# Altium PCB Secondary-PCB.PcbDoc (part 1 of 2)
Units mil, origin at the board's own origin, x right, y up, seen from the top; angles counter-clockwise.
Board outline 1653.54 x 3188.98 mil, 2 copper layers (Top Layer, Bottom Layer), stack 57 mil thick; 59 components, 38 nets, 219 pads, 81 vias.
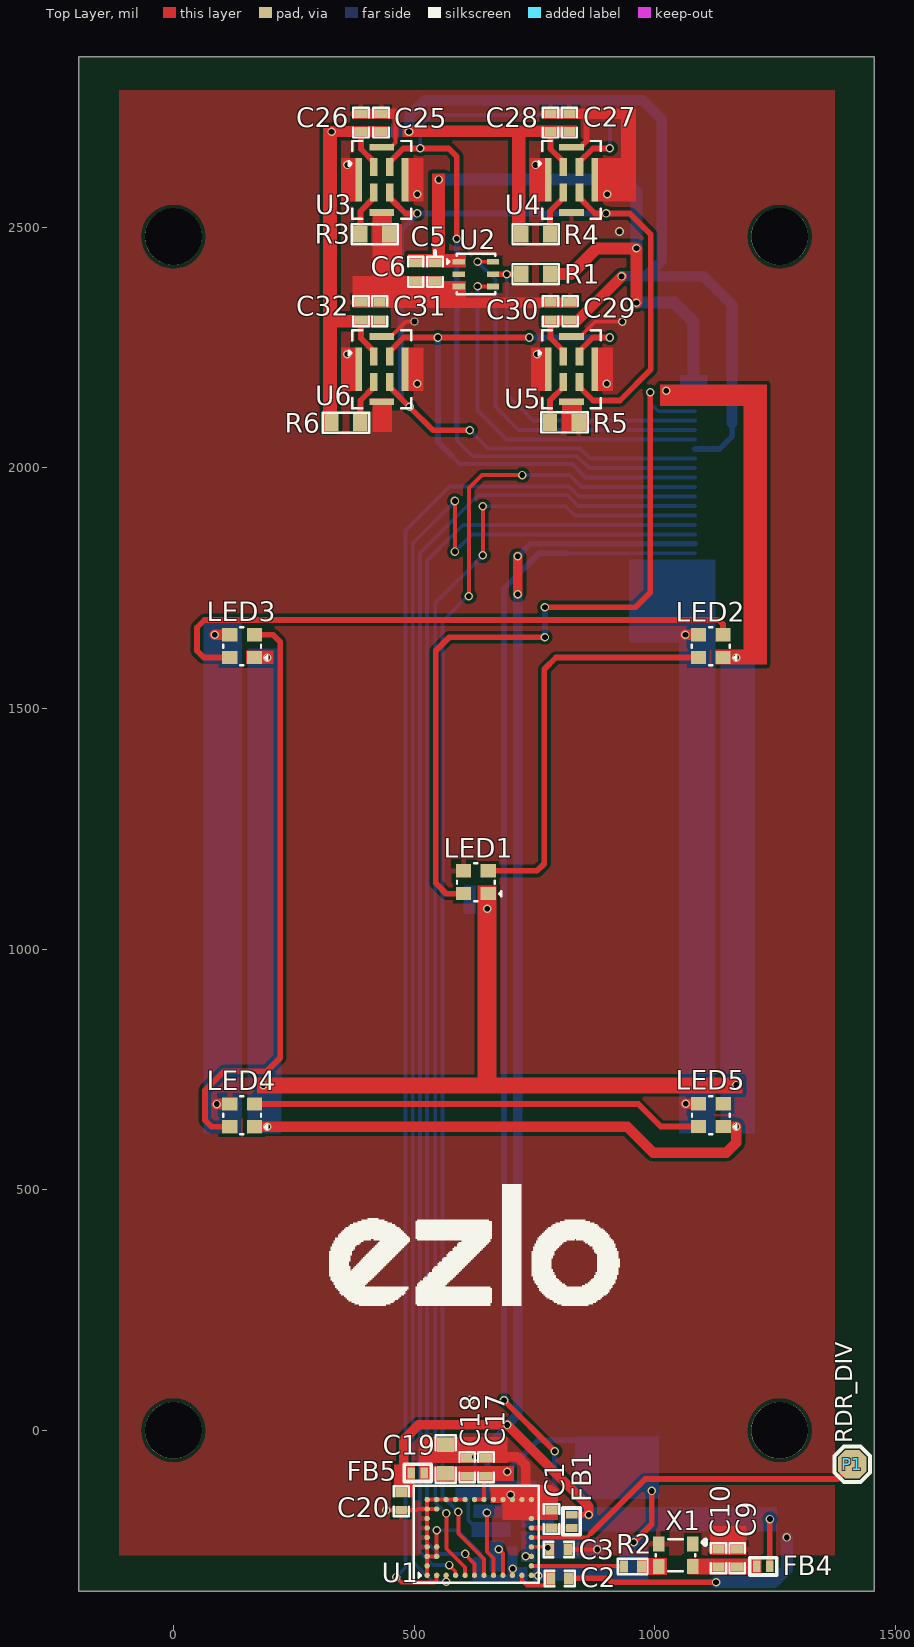
[diagram p0: Top Layer view]
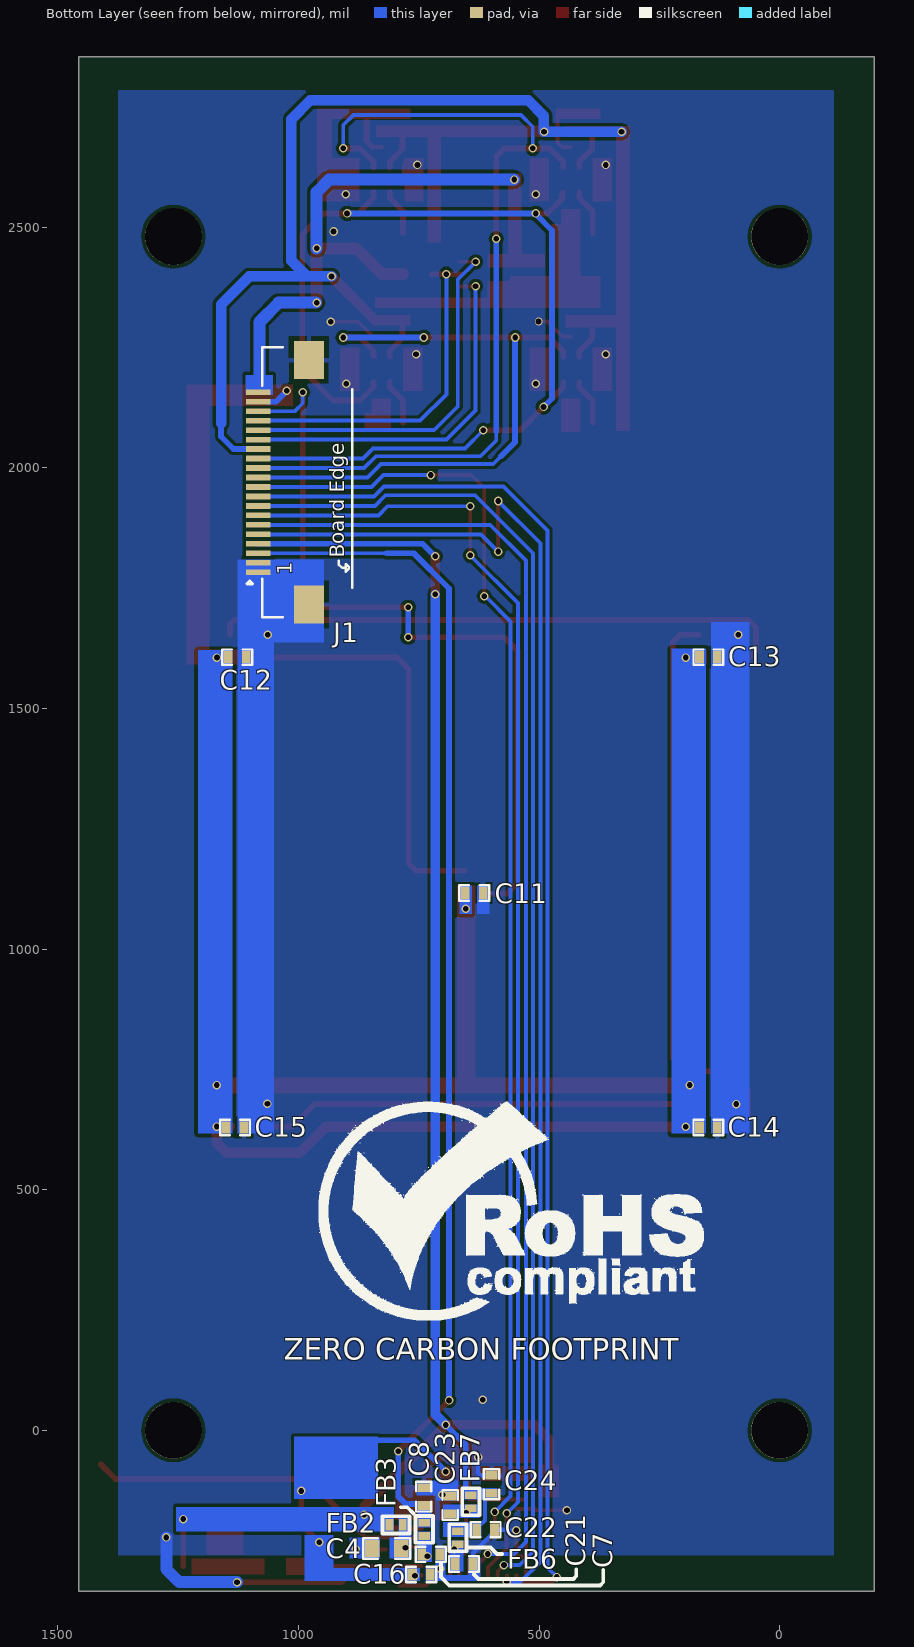
[diagram p1: Bottom Layer view, seen from below]
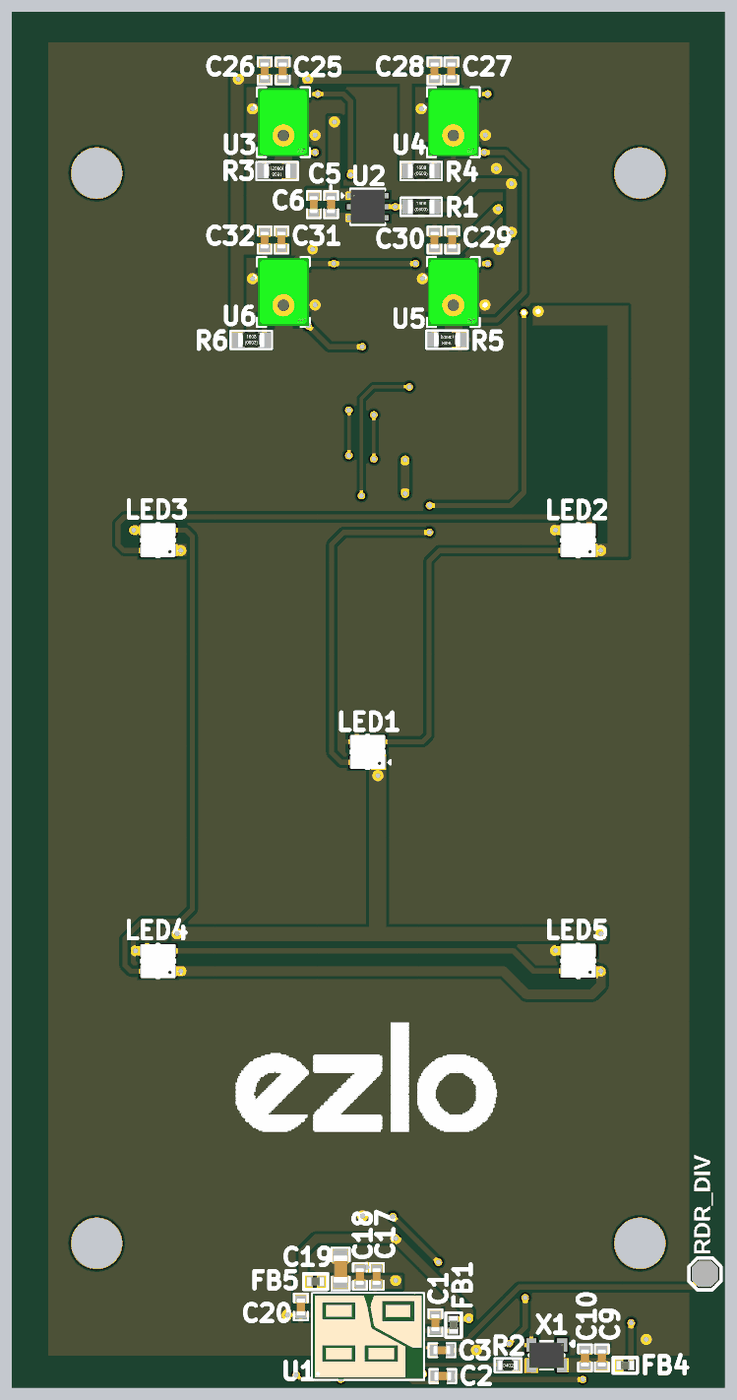
[diagram p2: 3D render of the assembled board from above, using the file's embedded part models]
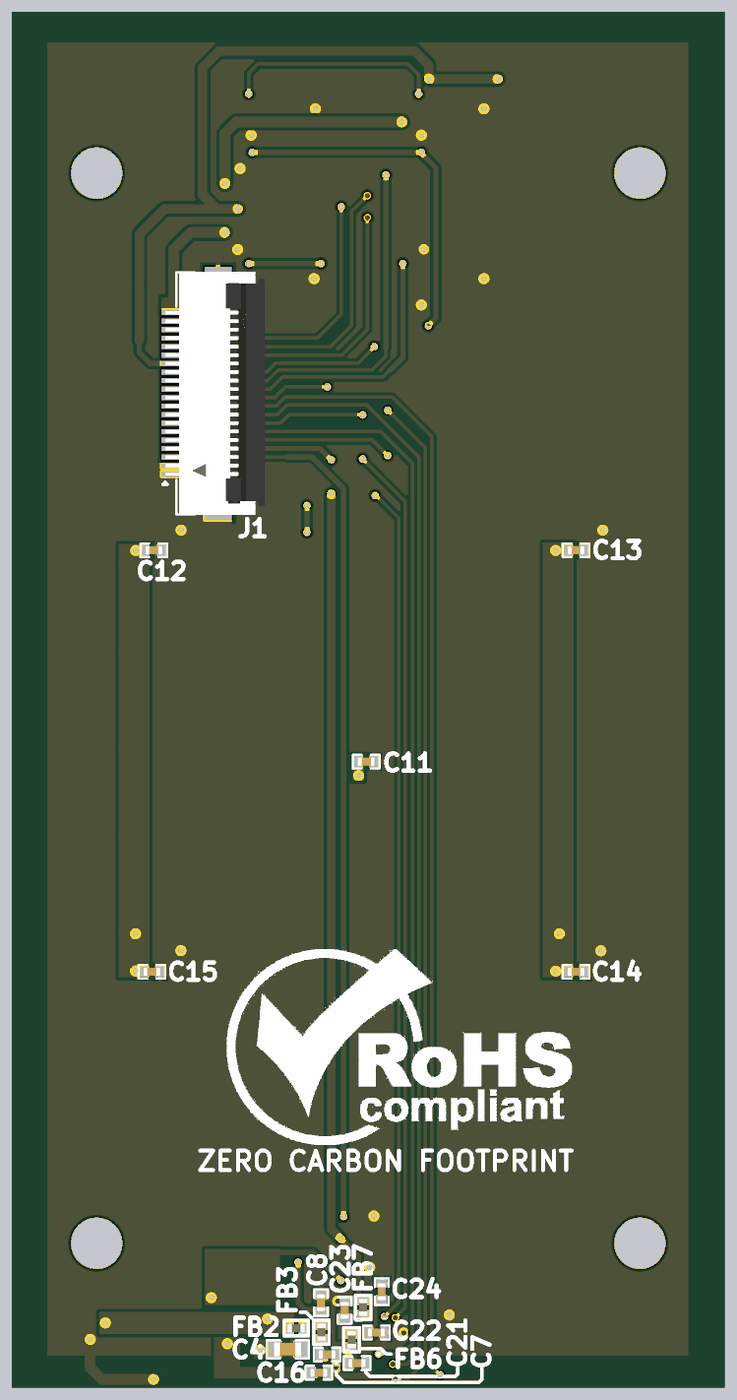
[diagram p3: 3D render of the assembled board from below, using the file's embedded part models]

## Layer stack, top to bottom
Top Solder: solder mask 3, Solder Resist, Dk 3.5
Top Layer: signal copper 10
Dielectric 1: dielectric 37, FR-4, Dk 4.8
Bottom Layer: signal copper 10
Bottom Solder: solder mask 3, Solder Resist, Dk 3.5

## Board outline
-196.85,-334.65 -196.85,2854.33 1456.69,2854.33 1456.69,-334.65

## Design rules (kind name [scope] priority, off if disabled: settings)
Clearance [All] p1: gap=7 ignorepadtopadclearanceinfootprint=FALSE except(0: Arc-Hole Track-Hole SMDPad-Hole THPad-Hole Via-Hole Fill-Hole Poly-Hole Region-Hole Text-Hole; 4: Arc-SMDPad Track-SMDPad SMDPad-SMDPad)
HoleSize [All] p1: absolutevalues=TRUE maxlimit=1000 minlimit=1 maxpercent=80.000 minpercent=20.000
HoleToHoleClearance [All] p1: gap=0 allowstackedmicrovias=TRUE
MinimumSolderMaskSliver [All] p1: minsoldermaskwidth=0
PolygonConnect [All] p1: thpad.connectstyle=Relief thpad.reliefconductorwidth=10 thpad.reliefentries=4 thpad.polygonreliefangle="90 Angle" thpad.airgapwidth=10 smdpad.connectstyle=Relief smdpad.reliefconductorwidth=10 smdpad.reliefentries=4 smdpad.polygonreliefangle="90 Angle" smdpad.airgapwidth=10 via.connectstyle=Direct via.reliefconductorwidth=10 via.reliefentries=4 via.polygonreliefangle="90 Angle" via.airgapwidth=10
RoutingVias [All] p1: holewidth=11.81 width=15.75 viastyle="Through Hole" minholewidth=11.81 minwidth=15.75 maxholewidth=11.81 maxwidth=23.62
SilkToSilkClearance [All] p1: silktosilkclearance=0
SilkToSolderMaskClearance [IsPad] p1: minsilkscreentomaskgap=0 clearancetoexposedcopper=TRUE
SolderMaskExpansion [All] p1: expansion=4 istentingtop=FALSE
Width [All] p1: maxlimit=40 minlimit=8 preferedwidth=22
25 further rules are at their usual default settings.

## Components (designator, comment, footprint, x,y, rotation, side; value= is the part's Value field where it differs from the comment)
C1 "1uF" Cap-0402 785.62,-184.13 r270 top locked
C2 "0.47uF" Cap-0402 802.62,-307.63 r0 top locked
C3 "1uF" Cap-0402 800.62,-247.63 r180 top locked
C4 "22uF" Cap-0603 816.62,-245.63 r180 bottom locked
C5 "0.1uF" Cap-0402 543.62,2407.37 r90 top locked
C6 "1uF" Cap-0402 503.62,2407.37 r90 top locked
C7 "1uF" Cap-0402 725.12,-257.63 r0 bottom locked
C8 "10uF" Cap-0402 739.62,-137.63 r270 bottom locked
C9 "1uF" Cap-0402 1171.62,-265.63 r90 top
C10 "10nF" Cap-0402 1132.62,-265.63 r90 top
C11 "0.1uF" Cap-0402 634.62,1116.37 r180 bottom locked
C12 "0.1uF" Cap-0402 1127.12,1606.37 r180 bottom locked
C13 "0.1uF" Cap-0402 148.12,1606.37 r180 bottom locked
C14 "0.1uF" Cap-0402 148.12,629.37 r180 bottom locked
C15 "0.1uF" Cap-0402 1131.62,629.37 r180 bottom locked
C16 "1uF" Cap-0402 744.62,-299.63 r0 bottom locked
C17 "1uF" Cap-0402 649.62,-76.63 r270 top locked
C18 "1uF" Cap-0402 610.62,-76.63 r270 top locked
C19 "22uF" Cap-0603 565.62,-59.63 r270 top locked
C20 "10uF" Cap-0402 473.62,-147.63 r90 top locked
C21 "0.1uF" Cap-0402 656.12,-277.63 r0 bottom locked
C22 "10uF" Cap-0402 611.12,-206.63 r0 bottom locked
C23 "1uF" Cap-0402 684.62,-155.07 r270 bottom locked
C24 "10uF" Cap-0402 598.62,-112.13 r270 bottom locked
C25 "1uF" Cap-0402 431.62,2717.37 r270 top locked
C26 "0.1uF" Cap-0402 389.62,2717.37 r270 top locked
C27 "1uF" Cap-0402 822.62,2717.37 r270 top locked
C28 "0.1uF" Cap-0402 783.62,2717.37 r270 top locked
C29 "1uF" Cap-0402 824.62,2325.37 r270 top locked
C30 "0.1uF" Cap-0402 783.62,2325.37 r270 top locked
C31 "1uF" Cap-0402 428.62,2325.37 r270 top locked
C32 "0.1uF" Cap-0402 389.62,2325.37 r270 top locked
FB1 "100MHz" IND-0402 827.62,-189.16 r90 top locked
FB2 "100MHz" IND-0402 797.05,-196.63 r0 bottom locked
FB3 "100MHz" IND-0402 738.62,-205.85 r90 bottom locked
FB4 "100MHz" IND-0402 1225.62,-282.63 r0 top
FB5 "100MHz" IND-0402 507.84,-88.63 r180 top locked
FB6 "100MHz" IND-0402 668.62,-223.41 r90 bottom locked
FB7 "100MHz" IND-0402 641.62,-148.41 r90 bottom locked
J1 "AFC01-S20FCC-00" AFC01-S20FCC-00 1030.98,1970 r90 bottom locked
LED1 "SK6812-EC20" SK6812-EC20 628.62,1138.87 r0 top locked
LED2 "SK6812-EC20" SK6812-EC20 1116.62,1629.37 r0 top locked
LED3 "SK6812-EC20" SK6812-EC20 142.62,1629.37 r0 top locked
LED4 "SK6812-EC20" SK6812-EC20 142.62,654.37 r0 top locked
LED5 "SK6812-EC20" SK6812-EC20 1117.03,654.75 r0 top locked
P1 "TEST POINT" Test-point 1410.62,-70.63 r0 top locked
R1 "10K" Res-0603 752.62,2402.37 r180 top locked
R2 "150R" Res-0402 954.12,-282.63 r0 top locked
R3 "10K" Res-0603 418.62,2485.37 r0 top locked
R4 "10K" Res-0603 752.62,2485.37 r180 top locked
R5 "10K" Res-0603 812.62,2094.37 r0 top locked
R6 "10K" Res-0603 358.62,2093.8 r180 top locked
U1 "BGT60TR13CE6327XUMA1" pg-vf2bga-40 635.62,-222.63 r0 top locked
U2 "LTR-303ALS" "6-Pin ChipLED" 628.62,2402.37 r0 top locked
U3 "MP34DT06JTR" MP34DT06JTR 433.12,2598.37 r180 top locked
U4 "MP34DT06JTR" MP34DT06JTR 827.12,2598.37 r180 top locked
U5 "MP34DT06JTR" MP34DT06JTR 827.12,2204.8 r180 top locked
U6 "MP34DT06JTR" MP34DT06JTR 433.12,2204.8 r180 top locked
X1 "80MHz" KC2016K 1043.62,-259.63 r180 top locked

## Footprints (in the part's own frame and the unit in brackets; to place one, negate y for a bottom-side part, rotate by r counter-clockwise, add the part's x,y. Pads: shape width x height; smd on the part's side, far side on the other; paste and mask are expansions set on the pad)
"6-Pin ChipLED" [mm] "SENSOR OPT AMBIENT 6DFN"
  rect 0.65x0.3 smd: 1(-0.9,0.65) 2(-0.9,0) 3(-0.9,-0.65) 4(0.9,-0.65) 5(0.9,0) 6(0.9,0.65)
  silkscreen extent -1.52,-1.07 1.02,1.07, body extent -1,-1 1,1, height 0.71
AFC01-S20FCC-00 [mm]
  rect 0.3x1.3 smd: 1(-4.75,1.34) 2(-4.25,1.34) 3(-3.75,1.34) 4(-3.25,1.34) 5(-2.75,1.34) 6(-2.25,1.34) 7(-1.75,1.34) 8(-1.25,1.34) 9(-0.75,1.34) 10(-0.25,1.34) 11(0.25,1.34) 12(0.75,1.34) 13(1.25,1.34) 14(1.75,1.34) 15(2.25,1.34) 16(2.75,1.34) 17(3.25,1.34) 18(3.75,1.34) 19(4.25,1.34) 20(4.75,1.34)
  rect 2x1.6 smd: MP1(-6.45,-1.34) MP2(6.45,-1.34)
  silkscreen extent -7.12,-3.63 7.12,1.91, body extent -7.15,-4.1 7.15,1.75, height 2.11
Cap-0402 [mil]
  rect 18x25 smd mask+2.36: 1(-18.5,0) 2(18.5,0)
  silkscreen extent -31,-16 31,16, body extent -20,-10 20,10, height 19
Cap-0603 [mil]
  rect 30x35 smd mask+2.36: 1(-30,0) 2(30,0)
  silkscreen extent -49,-21 49,21, body extent -32,-16 31,16, height 34
IND-0402 [mm]
  rect 0.4x0.6 smd: 1(-0.35,0) 2(0.35,0)
  silkscreen extent -0.71,-0.46 0.71,0.46, body extent -0.5,-0.25 0.5,0.25, height 0.25
KC2016K [mm]
  rect 0.6x0.8 smd: 1(-0.9,-0.6) 2(0.9,-0.6) 3(0.9,0.6) 4(-0.9,0.6)
  silkscreen extent -1.57,-0.84 1.04,0.84, body extent -1,-0.8 1,0.8, height 0.81
MP34DT06JTR [mm]
  rect 0.4x0.95 smd: 1(0.425,-0.675) 2(0.425,0.675) 3(-0.425,0.675) 4(-0.425,-0.675)
  rect 0.35x2.3 smd: 5(-1.225,0) 5(1.225,0)
  rect 1.3x0.35 smd: 5(0,1.725) 5(0,-1.725)
  silkscreen extent -1.55,-2.05 1.74,2.05, body extent -1.5,-2 1.5,2, height 1.1
pg-vf2bga-40 [mm]
  round 0.285 smd: A1(-2.75,-2) A2(-2.75,-1.5) A3(-2.75,-1) A4(-2.75,-0.5) A5(-2.75,0) A6(-2.75,0.5) A7(-2.75,1) A8(-2.75,1.5) A9(-2.75,2) B1(-2.25,-2) B3(-2.25,-1) B4(-2.25,-0.5) B8(-2.25,1.5) B9(-2.25,2) C1(-1.75,-2) C9(-1.75,2) D1(-1.25,-2) D9(-1.25,2) E1(-0.75,-2) E9(-0.75,2) F1(-0.25,-2) F9(-0.25,2) G1(0.25,-2) G9(0.25,2) H1(0.75,-2) H9(0.75,2) J1(1.25,-2) J9(1.25,2) K1(1.75,-2) K9(1.75,2) L1(2.25,-2) L9(2.25,2) M1(2.75,-2) M2(2.75,-1.5) M3(2.75,-1) M4(2.75,-0.5) M5(2.75,0) M6(2.75,0.5) M7(2.75,1) M9(2.75,2)
  silkscreen extent -3.45,-2.39 3.15,2.72, body extent -3.4,-2.32 3.1,2.68, height 0.9
Res-0402 [mil]
  rect 18x25 smd mask+2.17: 1(-18.5,0) 2(18.5,0)
  silkscreen extent -32,-17 32,16, body extent -23,-11 23,11, height 16
Res-0603 [mil]
  rect 30x35 smd: 1(-30,0) 2(30,0)
  silkscreen extent -48,-21 48,21, body extent -31,-17 31,17, height 18
SK6812-EC20 [mm]
  rect 0.8x0.7 smd: 1(0.65,-0.6) 2(0.65,0.6) 3(-0.65,0.6) 4(-0.65,-0.6)
  silkscreen extent -1,-1 1.35,1, body extent -1,-1 1,1, height 0.65
Test-point [mil]
  oct 60x60 smd: 1(0,0)
  silkscreen extent -37,-37 37,37

## Part data
C1 C3 C6 C7 C9 C16 C17 C18 C23 C25 C27 C29 C31: library part CC0402KRX5R6BB105, "CAP CER 1UF 10V X5R 0402", Case Code (Imperial)=0402, Case Code (Metric)=1005, Dielectric=X5R, LCSC Part Number=C106254, Manufacturer=Yageo, Max Operating Temperature=85°C, Min Operating Temperature=-55°C, Package Quantity=1, Resistor Type=Ceramic, Supplier Part Number 1=603-CC402KRX5R6BB105, Tolerance=10%, Voltage Rating=10V, Capacitance=1uF, Case/Package=0402, Category="Ceramic Capacitors", ComponentLink1Description=https://datasheet.ciiva.com/176/upy-gphc-x5r-4v-to-50v-12-176704.pdf?src-supplier=Digi-Key, ComponentLink1URL=https://datasheet.ciiva.com/176/upy-gphc-x5r-4v-to-50v-12-176704.pdf?src-supplier=Digi-Key, ComponentLink2Description=https://datasheet.ciiva.com/176/mlccorderingcode-176705.pdf?src-supplier=Digi-Key, ComponentLink2URL=https://datasheet.ciiva.com/176/mlccorderingcode-176705.pdf?src-supplier=Digi-Key, ComponentLink3Description=https://datasheet.ciiva.com/176/mlccorderingcode-176706.pdf?src-supplier=Digi-Key, ComponentLink3URL=https://datasheet.ciiva.com/176/mlccorderingcode-176706.pdf?src-supplier=Digi-Key, Construction=Flat, Depth=0.5mm, Dissipation Factor=15%, Halogen Free="Halogen Free", Height=0.5mm, Lead Free="Lead Free", Length=1mm, Manufacturer Part Number=CC0402KRX5R6BB105, Mount="Surface Mount", Number of Pins=2, Packaging="Tape and Reel", Pricing 1="1=0.11000, 10=0.05500, 50=0.05500, 100=0.03300, 500=0.02700, 1000=0.02200, 2500=0.02100, 10000=0.01800 (USD)", Radiation Hardening=No, REACH SVHC="No SVHC", RoHS=Yes, RoHS Compliant=Yes, Series=CC, Stock 1=6711367, Supplier 1=Mouser, Termination=SMD/SMT, Thickness=0.022inch, Voltage Rating (DC)=10V, Width=0.02inch
C2: library part UMK105ABJ474KV-F, "CAP CER 0.47UF 50V X5R 0402", Capacitance=470nF, Case Code (Imperial)=0402, Case Code (Metric)=1005, Dielectric=X5R, LCSC Part Number=C386109, Manufacturer="Taiyo Yuden", Max Operating Temperature=85°C, Min Operating Temperature=-55°C, Package Quantity=10000, Supplier Part Number 1=587-3497-1-ND, Tolerance=10%, Voltage Rating=50V, Case/Package=0402, Category="Ceramic Capacitors", ComponentLink1Description=https://datasheet.ciiva.com/30249/584umk105abj474kv-f-30249824.pdf?src-supplier=Onlinecomponents.com, ComponentLink1URL=https://datasheet.ciiva.com/30249/584umk105abj474kv-f-30249824.pdf?src-supplier=Onlinecomponents.com, ComponentLink2Description=https://datasheet.ciiva.com/24370/10umk105abj474kv-f-24370678.pdf?src-supplier=Onlinecomponents.com, ComponentLink2URL=https://datasheet.ciiva.com/24370/10umk105abj474kv-f-24370678.pdf?src-supplier=Onlinecomponents.com, ComponentLink3Description=https://datasheet.ciiva.com/18697/mlcc-all-e-18697429.pdf?src-supplier=Digi-Key, ComponentLink3URL=https://datasheet.ciiva.com/18697/mlcc-all-e-18697429.pdf?src-supplier=Digi-Key, ComponentLink4Description=https://datasheet.ciiva.com/18697/mlcc-all-e-18697430.pdf?src-supplier=Digi-Key, ComponentLink4URL=https://datasheet.ciiva.com/18697/mlcc-all-e-18697430.pdf?src-supplier=Digi-Key, ComponentLink5Description=https://datasheet.ciiva.com/18697/mlcc-all-e-18697431.pdf?src-supplier=Digi-Key, ComponentLink5URL=https://datasheet.ciiva.com/18697/mlcc-all-e-18697431.pdf?src-supplier=Digi-Key, Height=0.5mm, Item Type=Capacitor, Lead Free="Lead Free", Length=0.039inch, Manufacturer Part Number=UMK105ABJ474KV-F, Mount="Surface Mount", Packaging="Tape and Reel", Pricing 1="1=0.24000, 10=0.16100, 50=0.09680, 100=0.08170, 500=0.05592, 1000=0.04946, 2500=0.04731, 5000=0.04301 (USD)", RoHS=Yes, RoHS Compliant=Yes, Stock 1=145003, Supplier 1=Digi-Key, Termination=SMD/SMT, Thickness=0.022inch, Voltage Rating (DC)=50V, Width=0.02inch
C4 C19: library part CC0603MRX5R6BB226, "CAP CER 22UF 10V X5R 0603", Case Code (Imperial)=0603, Case Code (Metric)=1608, Dielectric=X5R, LCSC Part Number=C109447, Manufacturer=Yageo, Max Operating Temperature=85°C, Min Operating Temperature=-55°C, Package Quantity=4000, Supplier Part Number 1=311-1819-1-ND, Tolerance=20%, Voltage Rating=10V, Capacitance=22uF, Case/Package=0603, Category="Ceramic Capacitors", ComponentLink1Description=http://www.mouser.com/ds/2/447/Yageo_UPY-GP_NP0_16V-to-50V_9-358835.pdf?src-supplier=Mouser, ComponentLink1URL=http://www.mouser.com/ds/2/447/Yageo_UPY-GP_NP0_16V-to-50V_9-358835.pdf?src-supplier=Mouser, ComponentLink2Description=http://www.yageo.com/documents/recent/UPY-GPHC_X5R_4V-to-50V_25.pdf?src-supplier=Digi-Key, ComponentLink2URL=http://www.yageo.com/documents/recent/UPY-GPHC_X5R_4V-to-50V_25.pdf?src-supplier=Digi-Key, Halogen Free="Halogen Free", Height=0.8mm, Lead Free="Lead Free", Length=0.063inch, Manufacturer Part Number=CC0603MRX5R6BB226, Mount="Surface Mount", Packaging="Tape and Reel", Pricing 1="1=0.68000, 10=0.48000, 50=0.36300, 100=0.31610, 500=0.23416, 1000=0.19903 (USD)", RoHS=Yes, RoHS Compliant=Yes, Stock 1=19628, Supplier 1=Digi-Key, Termination=SMD/SMT, Thickness=0.035inch, Voltage Rating (DC)=10V, Weight=7.1E-05oz, Width=0.8mm
C5 C11 C12 C13 C14 C15: library part C1005X5R1H104K050BB, "CAP CER 0.1UF 50V X5R 0402", Capacitance=100nF, Case Code (Imperial)=0402, Case Code (Metric)=1005, Dielectric=X5R, Dielectric Material=Ceramic, LCSC Part Number=C2181865, Manufacturer=TDK, Max Operating Temperature=85°C, Min Operating Temperature=-55°C, Package Quantity=1, Supplier Part Number 1=445-5942-1-ND, Tolerance=10%, Voltage=50V, Case/Package=0402, ComponentLink1Description=https://product.tdk.com/info/en/catalog/spec/mlccspec_commercial_general_midvoltage_en.pdf?src-supplier=Digi-Key, ComponentLink1URL=https://product.tdk.com/info/en/catalog/spec/mlccspec_commercial_general_midvoltage_en.pdf?src-supplier=Digi-Key, ComponentLink2Description=http://www.tdk.co.jp/tefe02/e413_c.pdf?src-supplier=Future+Electronics, ComponentLink2URL=http://www.tdk.co.jp/tefe02/e413_c.pdf?src-supplier=Future+Electronics, ComponentLink3Description=https://www.verical.com/server-webapp/html/getDatasheet?partID=743571&src-supplier=Verical, ComponentLink3URL=https://www.verical.com/server-webapp/html/getDatasheet?partID=743571&src-supplier=Verical, ComponentLink4Description=http://www.tdk.co.jp/tefe02/e412_c.pdf?src-supplier=Avnet+Europe, ComponentLink4URL=http://www.tdk.co.jp/tefe02/e412_c.pdf?src-supplier=Avnet+Europe, Construction=Flat, Depth=0.5mm, Height=0.5mm, Lead Free="Lead Free", Length=1mm, Manufacturer Part Number=C1005X5R1H104K050BB, Mount="Surface Mount", Packaging="Tape and Reel", Pricing 1="1=0.12, 10=0.09, 50=0.049, 100=0.04, 500=0.02858, 1000=0.02245, 2500=0.02041, 5000=0.01878 (USD)", Radiation Hardening=No, REACH SVHC="No SVHC", Resistor Type=Ceramic, RoHS Compliant=Yes, Series=C, Stock 1=1455182, Supplier 1=Digi-Key, Termination=SMD/SMT, Thickness=0.022inch, Voltage Rating=50V, Voltage Rating (DC)=50V, Weight=2.3E-05oz, Width=0.02inch
C8 C20 C22 C24: library part CL05A106MP5NUNC, "CAP CER 10UF 10V X5R 0402", Case Code (Imperial)=0402, Case Code (Metric)=1005, Dielectric=X5R, LCSC Part Number=C315248, Manufacturer=Samsung, Max Operating Temperature=85°C, Min Operating Temperature=-55°C, Package Quantity=1, Tolerance=20%, Voltage Rating=10V, Capacitance=10uF, Case/Package=0402, Category="Ceramic Capacitors", ComponentLink1Description=https://datasheet.ciiva.com/25721/cl05a106mp5nunc-25721584.pdf?src-supplier=Digi-Key, ComponentLink1URL=https://datasheet.ciiva.com/25721/cl05a106mp5nunc-25721584.pdf?src-supplier=Digi-Key, ComponentLink2Description=https://datasheet.ciiva.com/26838/getdatasheetpartid-745310-26838170.pdf?src-supplier=Verical, ComponentLink2URL=https://datasheet.ciiva.com/26838/getdatasheetpartid-745310-26838170.pdf?src-supplier=Verical, Construction=Flat, Contact Plating=Tin, Depth=0.5mm, Item Type=Capacitor, Lead Free="Lead Free", Length=1mm, Manufacturer Part Number=CL05A106MP5NUNC, Mount="Surface Mount", Packaging="Tape and Reel", Pricing 1="10000=0.02537 (USD)", Radiation Hardening=No, RoHS=Yes, RoHS Compliant=Yes, Series=CL, Stock 1=1729850, Supplier 1=Avnet, Supplier Part Number 1=CL05A106MP5NUNC, Termination=Wraparound, Thickness=0.028inch, Width=0.02inch
C10: library part CC0402KRX7R8BB103, "CAP CER 10000PF 25V X7R 0402", Case Code (Imperial)=0402, Case Code (Metric)=1005, Dielectric=X7R, LCSC Part Number=C327025, Manufacturer=Yageo, Max Operating Temperature=125°C, Min Operating Temperature=-55°C, Package Quantity=1, Supplier Part Number 1=311-1337-1-ND, Tolerance=10%, Voltage Rating=25V, Capacitance=10nF, Case/Package=0402, ComponentLink1Description=http://www.yageo.com/documents/recent/UPY-GPHC_X7R_6.3V-to-50V_18.pdf?src-supplier=Digi-Key, ComponentLink1URL=http://www.yageo.com/documents/recent/UPY-GPHC_X7R_6.3V-to-50V_18.pdf?src-supplier=Digi-Key, ComponentLink2Description=https://www.verical.com/server-webapp/html/getDatasheet?partID=375418&src-supplier=Verical, ComponentLink2URL=https://www.verical.com/server-webapp/html/getDatasheet?partID=375418&src-supplier=Verical, ComponentLink3Description=http://www.yageo.com/documents/recent/UPY-GPHC_X7R_6.3V-to-50V_8.pdf?src-supplier=Avnet, ComponentLink3URL=http://www.yageo.com/documents/recent/UPY-GPHC_X7R_6.3V-to-50V_8.pdf?src-supplier=Avnet, ComponentLink4Description=https://4donline.ihs.com/images/VipMasterIC/IC/YAGO/YAGO-S-A0003557223/YAGO-S-A0003557223-1.pdf?hkey=52A5661711E402568146F3353EA87419&src-supplier=Element14, ComponentLink4URL=https://4donline.ihs.com/images/VipMasterIC/IC/YAGO/YAGO-S-A0003557223/YAGO-S-A0003557223-1.pdf?hkey=52A5661711E402568146F3353EA87419&src-supplier=Element14, ComponentLink5Description=http://www.farnell.com/datasheets/2167236.pdf?src-supplier=Element14, ComponentLink5URL=http://www.farnell.com/datasheets/2167236.pdf?src-supplier=Element14, ComponentLink6Description=http://www.mouser.com/ds/2/447/Yageo_UPY-GP_NP0_16V-to-50V_9-358835.pdf?src-supplier=Mouser, ComponentLink6URL=http://www.mouser.com/ds/2/447/Yageo_UPY-GP_NP0_16V-to-50V_9-358835.pdf?src-supplier=Mouser, Composition=Ceramic, Depth=0.5mm, Halogen Free="Halogen Free", Height=0.5mm, Lead Free="Lead Free", Length=1mm, Manufacturer Part Number=CC0402KRX7R8BB103, Mount="Surface Mount", Packaging="Tape and Reel", Pricing 1="1=0.1, 10=0.021, 100=0.0093, 500=0.00666, 1000=0.00523, 2500=0.00476, 5000=0.00438 (USD)", Radiation Hardening=No, REACH SVHC=Unknown, Stock 1=0, Supplier 1=Digi-Key, Termination=SMD/SMT, Thickness=0.022inch, Voltage Rating (DC)=25V, Width=0.02inch
C21: library part CL05B104KB54PNC, "CAP CER 0.1UF 50V X7R 0402", LCSC Part Number=C307331, Manufacturer=Samsung, Supplier Part Number 1=1276-CL05B104KB54PNCDKR-ND, Manufacturer Part Number=CL05B104KB54PNC, Pricing 1="1=0.1, 10=0.067, 50=0.0366, 100=0.0299, 500=0.02138, 1000=0.01681, 2500=0.01528, 5000=0.01406 (USD)", Stock 1=8594, Supplier 1=Digi-Key
C26 C28 C30 C32: library part CC0402KRX5R6BB104, "CAP CER 0.1UF 10V X5R 0402", Capacitance=100nF, Case Code (Imperial)=0402, Case Code (Metric)=1005, Dielectric=X5R, Insulation Resistance=10GR, LCSC Part Number=C129131, Manufacturer=Yageo, Max Operating Temperature=85°C, Min Operating Temperature=-55°C, Package Quantity=1, Supplier Part Number 1=311-1336-1-ND, Tolerance=10%, Voltage Rating=10V, Case/Package=0402, Category="Ceramic Capacitors", ComponentLink1Description=https://datasheet.ciiva.com/144/mlccorderingcode-144029.pdf?src-supplier=Digi-Key, ComponentLink1URL=https://datasheet.ciiva.com/144/mlccorderingcode-144029.pdf?src-supplier=Digi-Key, ComponentLink2Description=https://datasheet.ciiva.com/144/mlccorderingcode-144028.pdf?src-supplier=Digi-Key, ComponentLink2URL=https://datasheet.ciiva.com/144/mlccorderingcode-144028.pdf?src-supplier=Digi-Key, ComponentLink3Description=https://datasheet.ciiva.com/144/mlccorderingcode-144030.pdf?src-supplier=Digi-Key, ComponentLink3URL=https://datasheet.ciiva.com/144/mlccorderingcode-144030.pdf?src-supplier=Digi-Key, ComponentLink4Description=https://datasheet.ciiva.com/7978/1359354-7978091.pdf?src-supplier=Element14, ComponentLink4URL=https://datasheet.ciiva.com/7978/1359354-7978091.pdf?src-supplier=Element14, ComponentLink5Description=https://datasheet.ciiva.com/11587/upy-gphc-x5r-4v-to-50v-12-11587302.pdf?src-supplier=Avnet, ComponentLink5URL=https://datasheet.ciiva.com/11587/upy-gphc-x5r-4v-to-50v-12-11587302.pdf?src-supplier=Avnet, Depth=0.5mm, Dissipation Factor=5%, Halogen Free="Halogen Free", Height=0.5mm, Lead Free="Lead Free", Length=1mm, Manufacturer Part Number=CC0402KRX5R6BB104, Mount="Surface Mount", Number of Pins=2, Packaging="Tape and Reel", Pricing 1="1=0.10000, 10=0.02700, 50=0.01500, 100=0.01220, 500=0.00874, 1000=0.00687, 2500=0.00625, 5000=0.00575 (USD)", Radiation Hardening=No, REACH SVHC="No SVHC", RoHS=Yes, RoHS Compliant=Yes, Series=CC, Stock 1=6385580, Supplier 1=Digi-Key, Termination=SMD/SMT, Thickness=0.022inch, Voltage Rating (DC)=10V, Width=0.02inch
FB1 FB2 FB3 FB4 FB5 FB6 FB7: library part BLM15PD121SN1D, "FERRITE BEAD 120 OHM 0402 1LN", Case Code (Imperial)=0402, Case Code (Metric)=1005, Current Rating=1.3A, DC Resistance (DCR)=90mR, LCSC Part Number=C76891, Manufacturer=Murata, Max Operating Temperature=125°C, Min Operating Temperature=-55°C, Package Quantity=1, Tolerance=25%, Case/Package=0402, Category="Ferrite Beads and Chips", ComponentLink1Description=https://datasheet.ciiva.com/11800/0900766b811b5866-11800860.pdf?src-supplier=RSComponents, ComponentLink1URL=https://datasheet.ciiva.com/11800/0900766b811b5866-11800860.pdf?src-supplier=RSComponents, ComponentLink2Description=https://datasheet.ciiva.com/18093/getdatasheetpartid-195858-18093157.pdf?src-supplier=Verical, ComponentLink2URL=https://datasheet.ciiva.com/18093/getdatasheetpartid-195858-18093157.pdf?src-supplier=Verical, ComponentLink3Description=https://datasheet.ciiva.com/41425/001171686-da-01-en-chip-drossel0402-120r-1300ma-1-0x0-5mm-41425776.pdf?src-supplier=Conrad, ComponentLink3URL=https://datasheet.ciiva.com/41425/001171686-da-01-en-chip-drossel0402-120r-1300ma-1-0x0-5mm-41425776.pdf?src-supplier=Conrad, ComponentLink4Description=https://datasheet.ciiva.com/41449/001172205-da-01-en-drossel-0402-120r-11-0x0-5mm-10000st-41449495.pdf?src-supplier=Conrad, ComponentLink4URL=https://datasheet.ciiva.com/41449/001172205-da-01-en-drossel-0402-120r-11-0x0-5mm-10000st-41449495.pdf?src-supplier=Conrad, ComponentLink5Description=https://datasheet.ciiva.com/1012/l0110e-1012435.pdf?src-supplier=Digi-Key, ComponentLink5URL=https://datasheet.ciiva.com/1012/l0110e-1012435.pdf?src-supplier=Digi-Key, ComponentLink6Description=https://datasheet.ciiva.com/1012/l0110e-1012434.pdf?src-supplier=Digi-Key, ComponentLink6URL=https://datasheet.ciiva.com/1012/l0110e-1012434.pdf?src-supplier=Digi-Key, ComponentLink7Description=https://datasheet.ciiva.com/1012/l0110e-1012436.pdf?src-supplier=Digi-Key, ComponentLink7URL=https://datasheet.ciiva.com/1012/l0110e-1012436.pdf?src-supplier=Digi-Key, Core Material=Ferrite, DC Current=1.3A, DC Resistance-Max=90mR, Depth=0.55mm, Height=0.5mm, Impedance=120R, Item Type="Ferrite Bead", Lead Free="Lead Free", Length=1mm, Manufacturer Part Number=BLM15PD121SN1D, Material=Steel,Ferrite, Max Current Rating=1.3A, Max DC Current=1.3A, Military Standard=Not, Number of Circuits=1, Number of Lines=1, Number of Pins=2, Packaging="Tape and Reel", Pricing 1="10000=0.03238, 20000=0.03063, 40000=0.02888, 60000=0.02713, 80000=0.02538, 100000=0.02363, 1000000=0.02188 (USD)", Radiation Hardening=No, Reach SVHC Compliant=Yes, RoHS=Yes, RoHS Compliant=Yes, Series=BLM15PD, Stock 1=300000, Supplier 1=Avnet, Supplier Part Number 1=BLM15PD121SN1D, Termination=SMD/SMT, Test Frequency=100MHz, Width=0.5mm
J1: "Clamshell 20P Bottom Contact Surface Mount 0.5mm SMD,P=0.5mm FFC/FPC Connectors ROHS", LCSC Part Number=C262274, Manufacturer=JUSHUO, Package=SMD,P=0.5mm, ComponentLink1Description=LCSC, ComponentLink1URL=https://www.lcsc.com/product-detail/FFC-FPC-Connectors_JUSHUO-AFC01-S20FCC-00_C262274.html, Item Type="FPC Connector", Manufacturer Part Number=AFC01-S20FCC-00
LED1 LED2 LED3 LED4 LED5: "5mA -40℃~+80℃ RGB SMD,2x2mm Light Emitting Diodes (LED) ROHS", LCSC Part Number=C2909058, Manufacturer="OPSCO Optoelectronics", Package=SMD,2x2mm, ComponentLink1Description=LCSC, ComponentLink1URL=https://www.lcsc.com/product-detail/Light-Emitting-Diodes-LED_OPSCO-Optoelectronics-SK6812-EC20_C2909058.html, Item Type="RGB LED", Manufacturer Part Number=SK6812-EC20
P1: "Test Point ON", Item Type="TEST POINT"
R1 R3 R4 R5 R6: library part RC0603FR-0710KL, "RES SMD 10K Ohm 1% 1/10W 0603", Case Code (Imperial)=0603, Case Code (Metric)=1608, LCSC Part Number=C98220, Manufacturer=Yageo, Max Operating Temperature=155°C, Max Power Dissipation=100mW, Min Operating Temperature=-55°C, Resistance=10kR, Resistance Tolerance=1%, Resistor Type="Thick Film", Supplier Part Number 1=311-10.0KHRCT-ND, Temperature Coefficient=100ppm/°C, Voltage Rating=75V, Voltage Rating (DC)=50V, Case/Package=0603, Category="Chip SMD Resistors", ComponentLink1Description=https://datasheet.ciiva.com/7660/38590-7660789.pdf?src-supplier=Element14, ComponentLink1URL=https://datasheet.ciiva.com/7660/38590-7660789.pdf?src-supplier=Element14, ComponentLink2Description=https://datasheet.ciiva.com/7983/443971-7983596.pdf?src-supplier=Element14, ComponentLink2URL=https://datasheet.ciiva.com/7983/443971-7983596.pdf?src-supplier=Element14, ComponentLink3Description=https://datasheet.ciiva.com/22747/443971-22747519.pdf?src-supplier=Element14, ComponentLink3URL=https://datasheet.ciiva.com/22747/443971-22747519.pdf?src-supplier=Element14, ComponentLink4Description=https://datasheet.ciiva.com/46440/1868787-46440891.pdf?src-supplier=Element14, ComponentLink4URL=https://datasheet.ciiva.com/46440/1868787-46440891.pdf?src-supplier=Element14, ComponentLink5Description=https://datasheet.ciiva.com/7746/1738695-7746239.pdf?src-supplier=Element14, ComponentLink5URL=https://datasheet.ciiva.com/7746/1738695-7746239.pdf?src-supplier=Element14, ComponentLink6Description=https://datasheet.ciiva.com/15189/getdatasheetpartid-409289-15189591.pdf?src-supplier=Verical, ComponentLink6URL=https://datasheet.ciiva.com/15189/getdatasheetpartid-409289-15189591.pdf?src-supplier=Verical, Construction=Rectangular, Depth=0.8mm, Features="Moisture Resistant", Height=0.45mm, Item Type=Resistor, Lead Free="Lead Free", Lead Pitch=0.3mm, Length=1.6mm, Manufacturer Part Number=RC0603FR-0710KL, Military Standard=Not, Number of Pins=2, Number of Terminations=2, Packaging="Tape and Reel", Power Rating=100mW, Pricing 1="1=0.10000, 10=0.02400, 100=0.00970, 1000=0.00436, 2500=0.00378 (USD)", REACH SVHC=Unknown, RoHS=Yes, RoHS Compliant=Yes, Series=RC, Size Code=0603, Stock 1=25249139, Supplier 1=Digi-Key, Termination=SMD/SMT, Tolerance=1%, Weight=7.1E-05oz, Width=0.8mm
R2: library part ERJ-2GEJ151X, "RES SMD 150 OHM 5% 1/10W 0402", Case Code (Imperial)=0402, Case Code (Metric)=1005, LCSC Part Number=C412976, Manufacturer=Panasonic, Max Operating Temperature=155°C, Max Power Dissipation=100mW, Min Operating Temperature=-55°C, Package Quantity=10000, Ratings=AEC-Q200, Resistance Tolerance=5%, Resistor Type="Thick Film", Supplier Part Number 1=65T8254, Temperature Coefficient=200ppm/°C, Voltage Rating=50V, Case/Package=0402, Category="Chip SMD Resistors", ComponentLink1Description=https://datasheet.ciiva.com/11821/0900766b80f806dd-11821182.pdf?src-supplier=RSComponents, ComponentLink1URL=https://datasheet.ciiva.com/11821/0900766b80f806dd-11821182.pdf?src-supplier=RSComponents, ComponentLink2Description=https://datasheet.ciiva.com/43460/1500035-43460367.pdf?src-supplier=Farnell, ComponentLink2URL=https://datasheet.ciiva.com/43460/1500035-43460367.pdf?src-supplier=Farnell, ComponentLink3Description=https://datasheet.ciiva.com/6082/1500035-6082105.pdf?src-supplier=Farnell, ComponentLink3URL=https://datasheet.ciiva.com/6082/1500035-6082105.pdf?src-supplier=Farnell, ComponentLink4Description=https://datasheet.ciiva.com/46377/1500035-46377070.pdf?src-supplier=Element14, ComponentLink4URL=https://datasheet.ciiva.com/46377/1500035-46377070.pdf?src-supplier=Element14, ComponentLink5Description=https://datasheet.ciiva.com/28568/1678796-28568939.pdf?src-supplier=Element14, ComponentLink5URL=https://datasheet.ciiva.com/28568/1678796-28568939.pdf?src-supplier=Element14, ComponentLink6Description=https://datasheet.ciiva.com/16773/70260739-16773454.pdf?src-supplier=Allied+Electronics, ComponentLink6URL=https://datasheet.ciiva.com/16773/70260739-16773454.pdf?src-supplier=Allied+Electronics, ComponentLink7Description=https://datasheet.ciiva.com/30178/4aoa0000ce1-30178453.pdf?src-supplier=Onlinecomponents.com, ComponentLink7URL=https://datasheet.ciiva.com/30178/4aoa0000ce1-30178453.pdf?src-supplier=Onlinecomponents.com, Construction=Rectangular, Contact Plating=Tin, Depth=0.5mm, Features="Automotive AEC-Q200", Height=0.35mm, Item Type=Resistor, Lead Free="Lead Free", Length=1mm, Manufacturer Part Number=ERJ-2GEJ151X, Military Standard=Not, Mount="Surface Mount", Number of Terminations=2, Packaging="Tape and Reel", Power Rating=100mW, Pricing 1="1=0.10100, 25=0.03200, 100=0.01300, 250=0.01100, 500=0.00900, 1000=0.00500 (USD)", Radiation Hardening=No, Reach SVHC Compliant=Yes, Resistance=150R, RoHS=Yes, RoHS Compliant=Yes, Series=ERJ, Stock 1=19191, Supplier 1=Avnet, Technology="THICK FILM", Termination=SMD/SMT, Tolerance=5%, Voltage Rating (DC)=50V, Weight=2.8E-05oz, Width=0.5mm, Working Voltage=50V
U1: "Rf Transceiver PG-VF2BGA-40", LCSC Part Number=C3606641, Manufacturer=Infineon, Supplier Part Number 1=25AK0242, Category="RF Receivers, Transceivers", ComponentLink1Description=LCSC, ComponentLink1URL=https://www.lcsc.com/product-detail/RF-Transceiver-ICs_Infineon-Technologies-BGT60TR13CE6327XUMA1_C3606641.html, Item Type=IC, Manufacturer Part Number=BGT60TR13CE6327XUMA1, Pricing 1="1=20.67000, 10=18.89000, 25=17.50000, 50=16.72000, 100=15.93000, 250=15.16000, 500=14.94000, 1000=14.51000 (USD)", RoHS=No, Stock 1=4397, Supplier 1=Newark
U2: library part LTR-303ALS-01, "SENSOR OPT AMBIENT 6DFN", Case/Package=DFN, LCSC Part Number=C364577, Manufacturer="Vishay Lite-On", Max Operating Temperature=70°C, Min Operating Temperature=-30°C, Category=Uncategorized, ComponentLink1Description=http://optoelectronics.liteon.com/upload/download/DS86-2013-0004/LTR-303ALS-01_DS_V1.pdf?src-supplier=Digi-Key, ComponentLink1URL=http://optoelectronics.liteon.com/upload/download/DS86-2013-0004/LTR-303ALS-01_DS_V1.pdf?src-supplier=Digi-Key, ComponentLink2Description=http://optoelectronics.liteon.com/upload/download/DS86-2013-0004/P_100_LTR-303ALS-01%20DS.pdf?src-supplier=Avnet, ComponentLink2URL=http://optoelectronics.liteon.com/upload/download/DS86-2013-0004/P_100_LTR-303ALS-01%20DS.pdf?src-supplier=Avnet, Item Type="Ambient Light Sensor", Manufacturer Part Number=LTR-303ALS-01, Mounting Technology="Surface Mount", Output Type=I2C, Packaging="Cut Tape", Pins=6, Pricing 1="1=0.5742, 10=0.465, 25=0.4604, 100=0.394, 250=0.39, 500=0.3741, 1000=0.3355 (USD)", RoHS=Yes, RoHS Compliant=Yes, Series=-, Stock 1=1717, Supplier 1="Arrow Electronics", Supplier Part Number 1=LTR-303ALS-01
U3 U4 U5 U6: "MIC MEMS DIGITAL PDM OMNI -26DB", LCSC Part Number=C503097, Manufacturer=STMicroelectronics, Operating Supply Current=650uA, Supplier Part Number 1=511-MP34DT06JTR, Voltage Rating=1.8V, Category=Microphones, ComponentLink1Description=http://www.farnell.com/datasheets/2710895.pdf?src-supplier=Farnell, ComponentLink1URL=http://www.farnell.com/datasheets/2710895.pdf?src-supplier=Farnell, ComponentLink2Description=https://www.st.com/resource/en/datasheet/mp34dt06j.pdf?src-supplier=Digi-Key, ComponentLink2URL=https://www.st.com/resource/en/datasheet/mp34dt06j.pdf?src-supplier=Digi-Key, ComponentLink3Description=http://www.farnell.com/datasheets/2710895.pdf?src-supplier=Newark, ComponentLink3URL=http://www.farnell.com/datasheets/2710895.pdf?src-supplier=Newark, ComponentLink4Description=http://www.farnell.com/datasheets/2710895.pdf?src-supplier=Element14, ComponentLink4URL=http://www.farnell.com/datasheets/2710895.pdf?src-supplier=Element14, Direction=Omnidirectional, Item Type=Microphone, Manufacturer Part Number=MP34DT06JTR, Packaging="Cut Tape", Pricing 1="1=2.31, 10=1.92, 50=1.6, 100=1.51, 1000=1.24, 10000=1.23 (USD)", RoHS=Yes, RoHS Compliant=Yes, Series=-, Shape=Rectangular, Stock 1=6064, Supplier 1=Mouser, Termination=Solder
X1: library part KC2016K80.0000C1GE00, "XTAL OSC XO 80.0000MHZ CMOS SMD", Case/Package=SMD/SMT, Frequency Stability=50ppm, LCSC Part Number=C1988243, Manufacturer="Kyocera AVX", Max Operating Temperature=85°C, Max Supply Current=8mA, Min Operating Temperature=-40°C, Supplier Part Number 1=478-KC2016K80.0000C1GE00CT-ND, Category=Oscillators, ComponentLink1Description=http://www.mouser.com/ds/2/40/clock_k_e-522534.pdf?src-supplier=Mouser, ComponentLink1URL=http://www.mouser.com/ds/2/40/clock_k_e-522534.pdf?src-supplier=Mouser, ComponentLink2Description=http://www.kyocera-crystal.jp/eng/wp-content/uploads/2014/09/pkg_e.pdf?src-supplier=Digi-Key, ComponentLink2URL=http://www.kyocera-crystal.jp/eng/wp-content/uploads/2014/09/pkg_e.pdf?src-supplier=Digi-Key, ComponentLink3Description=http://global.kyocera.com/prdct/electro/product/pdf/clock_k_e.pdf?src-supplier=Digi-Key, ComponentLink3URL=http://global.kyocera.com/prdct/electro/product/pdf/clock_k_e.pdf?src-supplier=Digi-Key, Frequency=80MHz, Height=0.031inch, Item Type=Crystal, Lead Free="Lead Free", Length=0.079inch, Manufacturer Part Number=KC2016K80.0000C1GE00, Mount="Surface Mount", Packaging="Tape and Reel", Pricing 1="1=1.31000, 10=1.25300, 50=1.22440, 100=1.04940, 500=1.02024, 1000=0.85992 (USD)", RoHS=Yes, RoHS Compliant=No, Stock 1=350, Supplier 1=Digi-Key, Width=0.063inch

## Free pads (board coordinates)
  round 118.11 hole 118.11: MH(0,0) MH(0,2480.32) MH(1259.84,2480.32) MH(1259.84,0)

## Via types
v1: diameter 17.72, hole 11.81, Top Layer to Bottom Layer, 80 vias
v2: diameter 15.75, hole 11.81, Top Layer to Bottom Layer, 1 vias

## Nets (pads, with @x,y where several pads share a name; then routed paths per layer and width w, separated by ;. In a path a pad name is that pad's centre, name@x,y a point inside that pad or via, vN(x,y) a via of type N, cw(c..) or ccw(c..) an arc to the next point about the centre after c; other vN are vias at no path point)
1V8_SENSOR: C20.2 C22.2 C24.2 FB1.2 FB2.2 FB4.2 FB5.2 FB6.2 FB7.2 J1.4 | length 3194
  Top Layer w12: 479,-73.57 488.25,-82.82 492.18,-82.82 494.06,-84.69 FB5.2 ; FB1.2 v1(863.37,-175.38) ; FB4.2 v1@1239.4,-184.6
  Top Layer w20: 479,-73.57 479,-19.25 509.44,11.2 v1(693.81,11.2) 863.37,-158.37 v1(863.37,-175.38) ; v1(715.5,1737.5) v1(715.5,1816)
  Bottom Layer w8: C24.2@599.62,-130.63 C24.2@603.12,-130.63 ; C24.2@608.12,-139.13 608.12,-135.63 C24.2@603.12,-130.63 ; 612.62,-138 612.62,-187.18 623.56,-198.13 624.62,-198.13 629.62,-203.13 C22.2 ; FB7.2@641.62,-130.75 FB7.2@649.43,-130.75 ; FB7.2@641.62,-130.63 C24.2@603.12,-130.63 ; FB2.2 FB2.2@814.71,-192.75 ; v1@859.63,-175.38 v1(863.37,-175.38) v1@863.5,-175.51 ; 1228.5,-175.51 1228.62,-175.63
  Bottom Layer w12: FB7.2@652.43,-130.75 652.43,-30.18 v1(693.81,11.2) ; v1@715.75,1815.75 742.05,1842.05 J1.4
  Bottom Layer w20: v1(693.81,11.2) 715.5,32.89 v1(715.5,1737.5)
  other v1: 1239.62,-184.38
3V3: C5.2 C6.2 J1.20 R1.1 U2.1 | length 1106.1
  Top Layer w12: C6.2@502.35,2428.14 504.12,2426.37 C6.2
  Top Layer w25: R1.1 826.37,2402.37 879.99,2455.99 v1(962.18,2455.99) v1(962.18,2343)
  Bottom Layer w25: v1(551.62,2599) 936,2599 962.18,2572.82 v1(962.18,2455.99) ; v1@963.18,2343 1041,2343 1081,2303 1081,2187.54
3V3_AUD: C25.2 C26.2 C27.2 C28.2 C29.2 C30.2 C31.2 C32.2 J1.14 R4.2 R6.2 U3.1 U4.1 U5.1 U6.1 | length 2248.4
  Top Layer w12: C32.2@389.62,2305.3 389.62,2268.97 416.39,2242.2 U6.1 ; C26.2 389.62,2662.54 416.39,2635.77 U3.1 ; C30.2@783.62,2305.87 783.62,2269.54 810.39,2242.77 U5.1@810.39,2231.95 ; C28.2 783.62,2662.54 810.39,2635.77 U4.1
  Top Layer w22: C32.2@389.62,2305.3 C32.2@389.62,2305.37 ; 744.62,2698.37 C28.2@782.12,2698.37 ; 802.62,2306.37 840.07,2306.37 v1(931.31,2397.61)
  Bottom Layer w12: J1.14 1134.9,2038.9 1161.09,2065.09 1161.09,2092.38 1160.74,2092.74
  Bottom Layer w22: v1(328.62,2698.37) v1(489.62,2698.37) 489.93,2698.68 489.93,2730.93 522.37,2763.37 975.66,2763.37 1014.5,2724.53 1014.5,2430.26 981.85,2397.61 ; v1(931.31,2397.61) 981.85,2397.61 ; 1160.74,2092.74 1160.74,2339.26 1102.39,2397.61 981.85,2397.61
3V3_SENSOR: C8.2 FB3.2 J1.3 | length 2419.9
  Top Layer w12: v1@687.09,64.01 687.09,61.9 v1(792.62,-43.63)
  Bottom Layer w8: 817,1822.36 J1.3
  Bottom Layer w12: v1(687,62.1) 687,1749 760.36,1822.36 817,1822.36 ; C8.2 742.59,-153.16 776.84,-153.16 792.62,-137.38 v1(792.62,-43.63)
5V: C11.1 C12.1 C13.1 C14.1 C15.1 J1.19 LED1.1 LED2.1 LED3.1 LED4.1 LED5.1 | length 1180.1
  Top Layer w22: LED4.1 v1(195.24,630.75) 943.25,630.75 997,577 1149,577 1169.65,597.65 v1(1169.65,631.13) LED5.1 ; 654.21,718.63 658.02,714.81 680,714.81
  Bottom Layer w12: C13.1@173.65,1613.37 180.65,1606.37 181.12,1606.37 ; v1(1024,2160) 1046.68,2137.32 J1.19@1064.17,2137.32
  other v1: 186.62,717.37 1169.65,717.37 652.21,1083.96 195.24,1605.75 1169.24,1605.75
BGT_CLK: J1.9 U1.B1 | length 2931.2
  Top Layer w8: v1(463,-305) 474.37,-316.37 542.35,-316.37 547.03,-311.68 U1.B1
  Bottom Layer w8: v1(463,-305) 482.35,-285.65 482.35,1869.35 574,1961 822.21,1961 842.74,1940.47 J1.9
BGT_CS: J1.10 U1.G1 | length 2810.7
  Top Layer w8: v1(592.16,-169.7) 592.16,-214.16 645.46,-267.46 U1.G1 ; v1(614,1733) 614,1958 641,1985 v1(725,1985)
  Bottom Layer w8: v1(592.16,-169.7) 559,-136.54 559,1680.63 611.37,1733 v1(614,1733) ; v1(725,1985) 823,1985 847.84,1960.16 J1.10
BGT_IRQ: J1.5 U1.C1 | length 2959.6
  Top Layer w8: U1.C1 566.79,-301.44 v1(566.86,-314.96) v1(566.86,-314.96) ; v1(585,1826) v1(585,1931)
  Bottom Layer w8: v1(566.86,-314.96) 538.95,-314.96 497.35,-273.36 497.35,1843.35 v1(585,1931) ; v1(585,1826) 620.73,1861.73 J1.5
BGT_MISO: J1.7 U1.E1 | length 2736.5
  Top Layer w8: v1(567.21,-172.84) 567.4,-172.84 567.4,-245.99 606.09,-284.67 U1.E1 ; v1(643,1818) v1(643,1920)
  Bottom Layer w8: v1@567.01,-172.64 544,-149.63 544,1719 v1(643,1818) ; v1(643,1920) 815,1920 833.9,1901.1 J1.7
BGT_MOSI: J1.8 U1.D1 | length 2804.4
  Top Layer w8: v1(573,-280) 585.79,-292.79 585.79,-300.75 U1.D1
  Bottom Layer w8: v1(573,-280) 539.99,-280 512.35,-252.36 512.35,1822.56 632.79,1943 819,1943 841.21,1920.79 J1.8
BGT_RST: J1.6 U1.F1 | length 2769.1
  Top Layer w8: v1(606.37,-256.87) 605.68,-257.57 625.77,-277.67 U1.F1
  Bottom Layer w8: v1(606.37,-256.87) 551.86,-256.87 527.35,-232.36 527.35,1807.35 601.42,1881.42 J1.6
GND: C1.1 C2.2 C3.1 C4.1 C5.1 C6.1 C7.1 C8.1 C9.2 C10.2 C11.2 C12.2 C13.2 C14.2 C15.2 C16.1 C17.1 C18.1 C19.1 C20.1 C21.1 C22.1 C23.1 C24.1 C25.1 C26.1 C27.1 C28.1 C29.1 C30.1 C31.1 C32.1 J1.1 J1.2 J1.MP1 J1.MP2 LED1.3 LED2.3 LED3.3 LED4.3 LED5.3 R3.2 R5.2 U1.A1 U1.A2 U1.A3 U1.A4 U1.A5 U1.A6 U1.A7 U1.A8 U1.A9 U1.B3 U1.B4 U1.B8 U1.B9 U1.C9 U1.D9 U1.E9 U1.H9 U1.J9 U1.K1 U1.K9 U1.L9 U1.M7 U1.M9 U2.3 U3.5 U4.5 U5.5 U6.5 X1.2 | length 2331.4
  Top Layer w8: C25.1@427.12,2735.37 C25.1@431.62,2735.37 ; C25.1 456.93,2735.87 461.62,2731.19 461.62,2676.08 451.82,2666.29 U3.5@433.12,2666.29 ; U6.5@433.12,2272.71 451.82,2272.71 483.11,2304 v2(501,2304) ; v1(442.12,-166.13) C20.1 506.12,-166.13 508.67,-163.57 U1.A8 ; 508.62,2626.37 510.62,2626.37 ; U1.A1 U1.A2 U1.A3 ; v1@546.53,-207.63 546.78,-207.88 546.78,-242.06 U1.B4 U1.B3 U1.A3 ; U1.B8 U1.A8 ; U1.E9 U1.D9 U1.C9 U1.B9 U1.A9 U1.A8 ; C17.1 C17.1@653.12,-54.63 ; U1.H9 U1.J9 U1.K9 U1.L9 U1.M9 ; v1(700.63,-133.84) 720.41,-133.84 ; v1@704.12,-287.88 704.52,-288.28 U1.K1 ; 736.7,-150.13 743.12,-150.13 ; U1.M7 743.89,-150.13 ; U4.5@776,2638.37 778.89,2635.48 U4.5@778.89,2611.55 ; C3.1 v1(880.62,-247.63) ; U5.5@827.12,2137.46 839.73,2137.46 U5.5@842.62,2134.57 ; U5.5@827.12,2273.29 845.82,2273.29 875.9,2303.37 v1(932.62,2303.37) ; U4.5@827.12,2666.29 U4.5@845.82,2666.29 ; v1@1126.62,-315.63 v1@1127.62,-314.63 ; U1.A3 U1.A4 U1.A5 U1.A6 U1.A7 U1.A8
  Top Layer w12: 723.62,-130.63 732,-139.01 743.12,-150.13 ; v1@752.62,2629 778,2629 778.89,2628.11 U4.5@778.89,2598.37 ; C2.2@820.12,-307.63 902.62,-307.63 910.62,-315.63 v1@1126.62,-315.63 ; U4.5@845.82,2666.29 858.62,2679.08 858.62,2734.37
  Top Layer w20: C17.1@653.12,-54.63 714.63,-54.63 732,-72 732,-139.01
  Top Layer w22: v1(86,1652.99) LED3.3 ; v1(90.43,677.99) LED4.3 ; v1(1064,1652.99) LED2.3 ; v1(1064.4,678.37) LED5.3
  Bottom Layer w8: v1@546.53,-207.63 591.62,-207.63 C22.1 592.62,-210.13 637.62,-255.13 C21.1 ; C24.1@599.62,-93.63 621.93,-93.63 626.62,-88.94 v1(626.62,-55.63) ; C23.1 685.98,-135.2 698.69,-135.2 699.09,-135.6 v1@703.83,-130.86 ; v1(700.63,-133.84) 703.62,-130.86 v1@703.83,-130.86 ; 706.62,-302.63 713.62,-309.63 C16.1@726.12,-309.63 ; v1@706.62,-292.63 C7.1 ; C8.1@727.62,-120.11 714.57,-120.11 v1@703.83,-130.86 ; C8.1 734.62,-124.13 724.11,-124.13 717.39,-130.86 v1@703.83,-130.86
  Bottom Layer w25: v1(1127.62,-315.63) 1247.37,-315.63 1274.62,-288.38 v1(1274.62,-222.63)
  other v1: 705.12,-287.88 547.53,-207.63 616.81,63.37 506.62,2174.8 900.62,2174.8 361.62,2235.8 755.62,2235.8 927,2491 506.62,2568.37 901.62,2568.37 361.62,2629.37 752.62,2629.37
INT_ALS: J1.17 R1.2 U2.5 | length 722.2
  Top Layer w12: U2.5 v1(692.62,2402.37) R1.2
  Bottom Layer w8: v1(692.62,2402.37) 692.62,2152.38 747.05,2097.95 J1.17
LED_DIN: J1.18 LED1.4 | length 1621.3
  Top Layer w8: LED1.4@602.7,1114.92 LED1.4
  Top Layer w12: LED1.4@602.7,1114.92 567.08,1114.92 545,1137 545,1620 573,1648 v1(772,1648) ; v1(772,1710) 960,1710 991,1741 v1(991,2157)
  Bottom Layer w8: v1(991,2157) 991,2134 1007.36,2117.64 J1.18
  Bottom Layer w12: v1(772,1648) v1(772,1710)
MIC_CLK: J1.13 U3.3 U4.3 U5.3 U6.3 | length 2271.3
  Top Layer w12: U6.3 449.85,2167.4 v1(490.73,2126.52) 539.25,2078 v1(616,2078) ; U3.3 451.72,2569.92 451.72,2559.1 482.31,2528.51 v1(506.62,2528.51) ; U5.3@843.85,2178.8 843.85,2167.97 871.81,2140.01 928.01,2140.01 992,2204 992,2484.99 948.47,2528.51 v1(899,2528.51) 876.31,2528.51 843.85,2560.97 U4.3
  Bottom Layer w8: v1@506.62,2526.62 v1(506.62,2528.51) ; v1(616,2078) 654,2040 845,2040 865.79,2019.21 J1.13
  Bottom Layer w12: v1(490.73,2126.52) 473,2144.25 473,2493 v1@506.62,2526.62 ; v1(506.62,2528.51) v1(899,2528.51)
MIC_PDM12: J1.12 U3.4 U4.4 | length 1868.9
  Top Layer w12: U3.4 449.85,2635.77 477.81,2663.73 v1(512.98,2663.73) 572.26,2663.73 589,2646.99 v1(589,2476) ; U4.4 843.85,2635.77 871.81,2663.73 v1(906.98,2663.73)
  Bottom Layer w8: v1(512.98,2663.73) 512.98,2708.73 537.62,2733.37 885.62,2733.37 906.98,2712.01 v1(906.98,2663.73) ; 589,2075 589,2057 622,2024 839,2024 863.47,1999.53 J1.12
  Bottom Layer w12: 589,2075 v1(589,2476)
MIC_PDM34: J1.11 U5.4 U6.4 | length 1343.2
  Top Layer w12: U6.4 449.85,2242.2 478.38,2270.73 v1(549.73,2270.73) v1(739.62,2270.73) ; U5.4@843.85,2231.95 843.85,2242.77 871.81,2270.73 v1(906.98,2270.73)
  Bottom Layer w8: 579,2024 595.19,2007.81 828.19,2007.81 856.16,1979.84 J1.11
  Bottom Layer w12: v1(549.73,2270.73) 549.73,2053.27 579,2024 ; v1@743.62,2270.73 v1(906.98,2270.73)
NetLED1_2: LED1.2 LED2.4 | length 857.1
  Top Layer w12: LED1.2 755.74,1162.49 770.62,1177.37 770.62,1581.37 795,1605.75 LED2.4
NetLED2_2: LED2.2 LED3.4 | length 1247.2
  Top Layer w12: LED3.4 63.25,1605.75 49,1620 49,1668 64.78,1683.78 1133.22,1683.78 1142.21,1674.79 LED2.2
NetLED3_2: LED3.2 LED4.4 | length 1227.4
  Top Layer w12: LED4.4 79.25,630.75 65.62,644.38 65.62,706.37 105.25,746 194,746 222,774 222,1638 207.01,1652.99 LED3.2
NetLED4_2: LED4.2 LED5.4 | length 942.6
  Top Layer w12: LED4.2 966.01,677.99 1012.87,631.13 LED5.4
NetP1_1: P1.1 U1.M5 | length 729.7
  Top Layer w8: U1.M5 859,-222.63 867.81,-213.81
  Top Layer w12: 867.81,-213.81 980.63,-101 1380.25,-101 P1.1
NetR3_1: R3.1 U3.2 | length 95.9
  Top Layer w12: R3.1@388.62,2487.37 388.62,2533.2 416.39,2560.97 U3.2
NetR4_1: R4.1 U4.2 | length 95.9
  Top Layer w12: R4.1@782.62,2487.37 782.62,2533.2 810.39,2560.97 U4.2
NetR5_1: R5.1 U5.2 | length 95.9
  Top Layer w12: R5.1 782.62,2140.2 810.39,2167.97 U5.2@810.39,2178.8
NetR6_1: R6.1 U6.2 | length 95.9
  Top Layer w12: R6.1 388.62,2139.63 416.39,2167.4 U6.2
OS_OT: R2.2 X1.3
OSC_80M: R2.1 U1.M2 | length 193.1
  Top Layer w8: U1.M2 935.67,-281.68 R2.1@936.62,-282.63
SCL: J1.15 U2.4 | length 766.6
  Top Layer w8: v1(632,2377) U2.4@663.83,2377
  Bottom Layer w8: v1(632,2377) 632,2119 692.42,2058.58 J1.15
SDA: J1.16 U2.6 | length 783.3
  Top Layer w8: v1(632,2428) U2.6
  Bottom Layer w8: v1(632,2428) 669,2391 669,2127 717.73,2078.27 J1.16
VAREF: C2.1 U1.L1 | length 71.1
  Top Layer w8: U1.L1 724.2,-312.2 734.63,-322.63 774.27,-322.63 ; C2.1@778.96,-303.78 C2.1@783.12,-299.63
VDD_A: C21.2 FB6.1 U1.J1 | length 87.4
  Top Layer w8: v1@676,-247.71 v1(676,-247) 684.83,-255.83 U1.J1
  Bottom Layer w8: C21.2 674.62,-252.38 v1@677,-250
VDD_D: C23.2 FB7.1 U1.H1 | length 135.1
  Top Layer w8: v1(651.62,-171.63) 651.62,-252.32 665.15,-265.85 665.15,-300.42 U1.H1@665.62,-300.9
VDD_LF: C7.2 FB3.1 U1.M3 | length 12.9
  Top Layer w8: v1@730.99,-262 U1.M3
  other v1: 731.99,-262
VDD_OSC: C9.1 C10.1 FB4.1 X1.4
VDD_PLL: C3.2 C4.2 FB2.1 U1.M4 | length 40.6
  Top Layer w8: U1.M4 744.13,-242.07 C3.2@784.4,-242.07
  other v1: 777.62,-243.83
VDD_RF: C16.2 C17.2 C18.2 C19.2 FB5.1 U1.F9 U1.G9 U1.M1 | length 488.6
  Top Layer w8: U1.F9 U1.G9 645.46,-100.29 C17.2@649.62,-96.13 ; C17.2 684.31,-95.13 v1(693.62,-85.82) ; U1.M1 v1@757.88,-301.37
  Top Layer w12: v1(956.62,-232.63) 994,-195.25 v1(994,-126)
  Bottom Layer w12: v1(693.62,-85.82) 758.81,-20.63 893.62,-20.63 899.62,-26.63
  other v1: 757.88,-302.37
VDD_VCO: C1.2 FB1.1 U1.M6 | length 83.7
  Top Layer w10: U1.M6 FB1.1
pads on no net: LED5.2 U2.2 X1.1

## Polygon pours and split planes (outlines as drawn)
GND on Bottom Layer "Top Layer-GND" (solid, remove dead copper, pour order 2): -112,-260 1374,-260 1374,2784 -112,2784
GND on Top Layer "Top Layer-GND" (solid, remove dead copper, pour order 0): -112,-260 1374,-260 1374,2784 -112,2784

## Other copper
Top Layer:
  region net 5V: 208,1620.63 151,1620.63 151,1592 208,1592
  region net 5V: 1232,2173 1011,2173 1011,2128 1232,2128
  region net 5V: 1233,1600.38 1233,2173 1185,2173 1185,1600.38
  region net 5V: 1233,1622 1126,1622 1126,1591 1233,1591
  region net 5V: 671,701 671,1132.37 632,1132.37 632,701
  rectangle net 5V: 174,700 1183,733
  region net 3V3_AUD: 311,2709.99 311,2076 340.25,2076 340.25,2709.99
  rectangle net GND: 658.62,-151 784.73,-113.63
  rectangle net GND: 873.62,2159.43 913.62,2249.8
  region net GND: 782.62,2249.8 742.62,2249.8 742.62,2159.43 782.62,2159.43
  rectangle net 3V3_AUD: 703.29,2468 731.29,2703
  region net GND: 388.62,2249.8 348.62,2249.8 348.62,2159.43 388.62,2159.43
  rectangle net GND: 479.62,2159.43 519.62,2249.8
  region net GND: 779.62,2643.37 739.62,2643.37 739.62,2553 779.62,2553
  rectangle net GND: 479.62,2553 519.62,2643.37
  rectangle net VDD_RF: 741.89,-306 763.89,-296.37
  rectangle net GND: 683.62,-186.63 799,-121.63
  rectangle net VDD_PLL: 769.62,-261.63 791.62,-233.63
  rectangle net GND: 1114.62,-258.63 1190.62,-198.63
  rectangle net 3V3: 537,2425.87 564.62,2612
  region net GND: 388.62,2643.37 348.62,2643.37 348.62,2553 388.62,2553
  rectangle net GND: 930.62,2592.37 961,2746.37
  rectangle net GND: 872.62,2553.37 961,2643.37
  rectangle net GND: 422,2393.37 474.62,2506.37
  rectangle net GND: 413.62,2335.37 454,2537.37
  rectangle net GND: 413.62,2074.8 454.62,2143.8
  rectangle net GND: 372.62,2332.37 840.62,2354.37
  rectangle net GND: 372.62,2724.37 465.62,2746.37
  rectangle net GND: 766.62,2724.37 958.62,2746.37
  rectangle net GND: 807.62,2075.37 862.62,2114.37
  rectangle net GND: 807.62,2075.37 848.62,2144.37
  rectangle net GND: 510.62,-53.63 694,-14
  rectangle net 1V8_SENSOR: 458.62,-139.63 501.84,-70.63
  rectangle net GND: 510.62,-67.63 694,-36.63
  rectangle net VDD_RF: 510.62,-105.63 707.62,-74.63
  rectangle net VDD_OSC: 1070.62,-299.63 1222,-266.63
  rectangle net OS_OT: 963.62,-300.63 1025.62,-265.63
  rectangle net VAREF: 774.27,-326.63 793.62,-294.63
  rectangle net 3V3_AUD: 314,2291.37 444.62,2318
  rectangle net 3V3_AUD: 318,2687.37 444.62,2710
  rectangle net 3V3_AUD: 476,2687.37 838.62,2711
  rectangle net 3V3_AUD: 766.62,2295.37 838.62,2317.37
  rectangle net GND: 372.62,2360.37 560.62,2398.37
  rectangle net GND: 372.62,2334.37 607.62,2388.37
  rectangle net 3V3: 487.62,2416.37 607.62,2444.37
  region net GND: 783.43,-113.31 799,-121.63 773.91,-140.58
Bottom Layer:
  rectangle net GND: 947,1637 1126.12,1809
  rectangle net 3V3: 1053,2151 1110,2193
  rectangle net VDD_RF: 747.62,-312.63 987.12,-286.63
  rectangle net VDD_RF: 834.62,-143 1009,-13
  rectangle net VDD_RF: 926.62,-312.63 987.12,-217.63
  rectangle net GND: 621.62,-313.63 703.62,-300.63
  rectangle net GND: 621.62,-309.63 646.62,-264.63
  rectangle net 1V8_SENSOR: 801.62,-210.63 1254,-159
  region net GND: 1126.12,1671.37 1050.62,1671.37 1050.62,616.37 1126.12,616.37
  region net GND: 142.62,1679.37 62.62,1679.37 62.62,616.37 142.62,616.37
  rectangle net GND: 602.62,1072.37 628.62,1132.37
  rectangle net 5V: 639.62,1072.37 665.62,1132.37
  rectangle net 5V: 1137.12,616.37 1209,1621
  rectangle net 5V: 153.62,616.37 225,1624
  rectangle net GND: 668.62,-145.89 714.36,-122.63
  rectangle net GND: 668.62,-135.6 754.62,-104.63
  rectangle net GND: 703.62,-313.63 735.62,-283.63